# Altium PCB Thunderscope_Rev5.3.PcbDoc (part 9 of 14)
Units mil, origin at the board's own origin, x right, y up, seen from the top; angles counter-clockwise.
Board outline 3937.01 x 3838.58 mil, 6 copper layers (F.Cu, In1.Cu (GND), In2.Cu (Sign), In3.Cu (Sign), In4.Cu (GND), B.Cu), stack 60.556 mil thick; 911 components, 486 nets, 2834 pads, 2761 vias.
Unrouted connection lines stored in the file: 618.
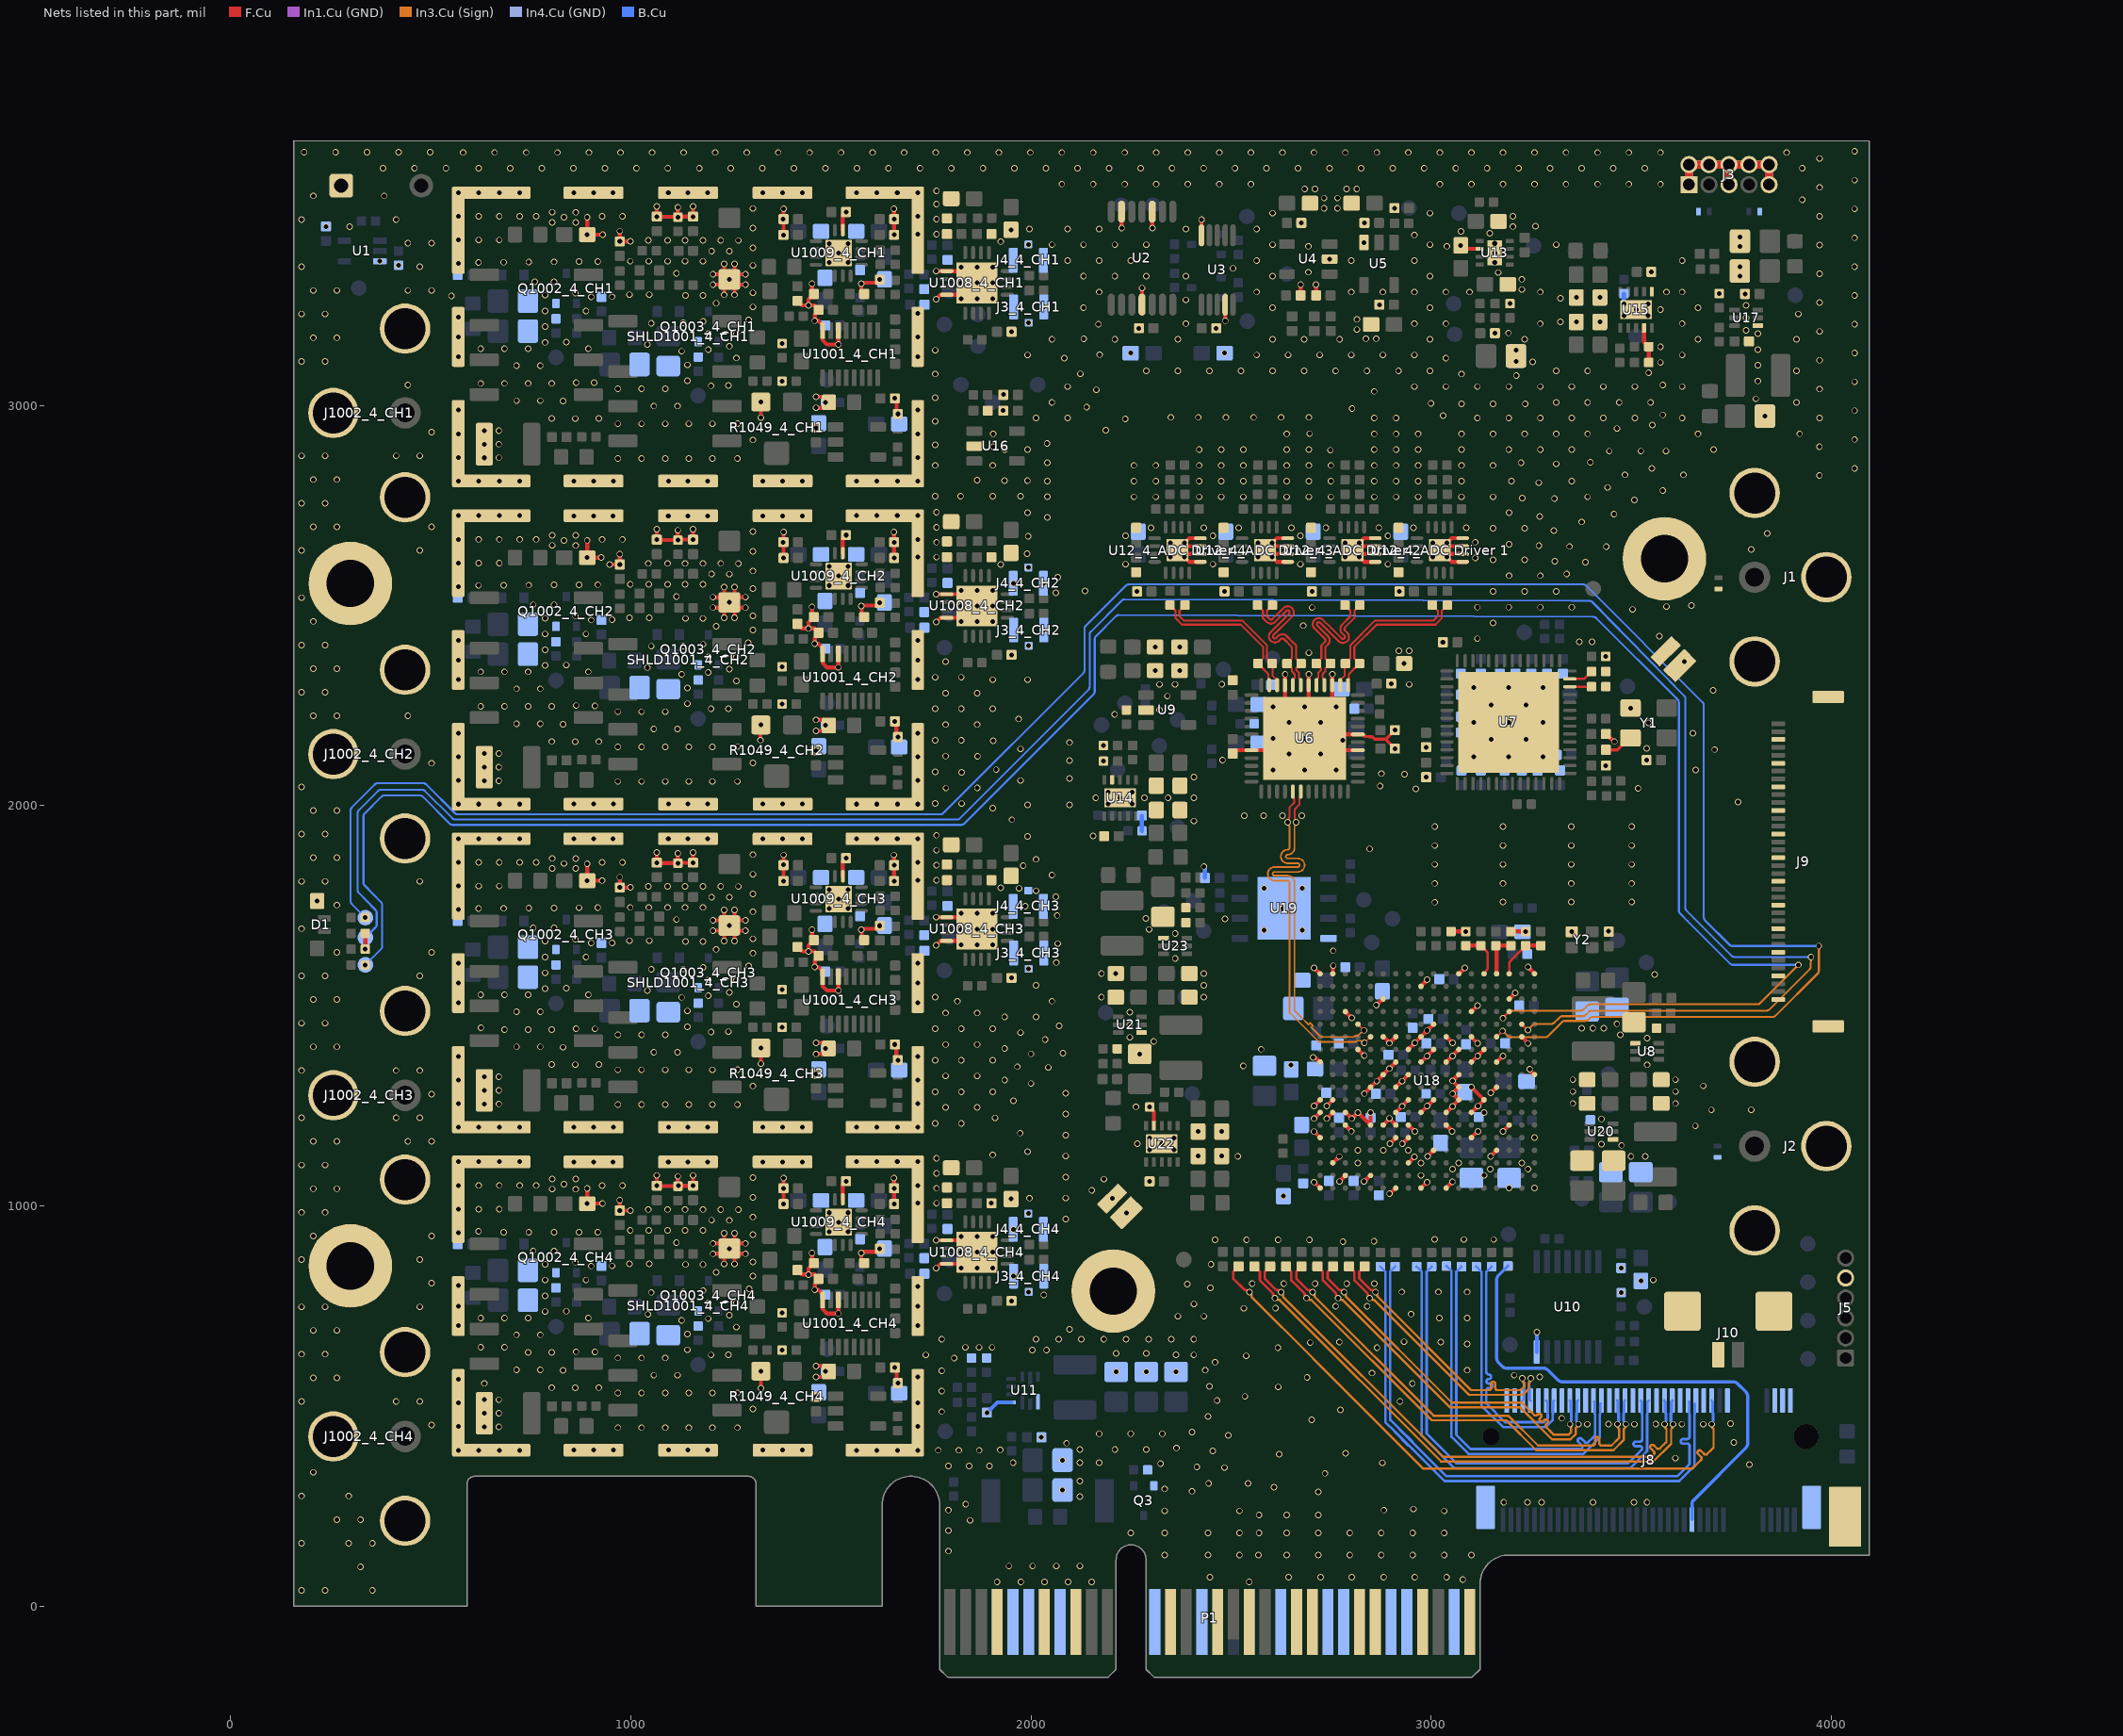
[diagram p12: the nets of this part, all layers, seen from the top]

## Via types
v1: diameter 16, hole 11.81, F.Cu to B.Cu, tented both sides, 2761 vias

## Nets (pads, with @x,y where several pads share a name; then routed paths per layer and width w, separated by ;. In a path a pad name is that pad's centre, name@x,y a point inside that pad or via, vN(x,y) a via of type N, cw(c..) or ccw(c..) an arc to the next point about the centre after c; other vN are vias at no path point) (continued)
GND: (continued)
  other v1: 177.12,39.37 236.18,39.37 354.29,39.37 1915.35,61.02 1974.41,61.02 2033.46,61.02 2092.52,61.02 2151.57,61.02 2545.28,61.02 3078.74,66.93 2446.85,72.83 2643.7,72.83 2723.43,72.83 2801.18,72.83 2880.91,72.83 2958.66,72.83 3038.39,72.83 324.76,98.43 1944.88,100.39 2003.94,100.39 2062.99,100.39 2122.05,100.39 2333.66,127.95 2441.93,127.95 2520.67,127.95 2567.89,127.95 2638.78,127.95 2717.52,127.95 2796.26,127.95 2875,127.95 2953.74,127.95 3032.48,127.95 3100.39,127.95 1793.31,137.8 177.12,157.48 295.23,157.48 354.29,157.48 2249.02,183.07 2333.66,183.07 2441.93,183.07 2520.67,183.07 2569.88,183.07 2638.78,183.07 2717.52,183.07 2796.26,183.07 2875,183.07 2953.74,183.07 3032.48,183.07 1793.31,188.98 1847.44,214.57 265.7,216.54 324.76,216.54 2569.88,228.35 2638.78,228.35 2717.52,228.35 2333.66,238.19 2520.67,238.19 3032.48,238.19 1793.31,240.16 2881.89,240.16 2955.73,242.93 1836.68,254.99 3181.1,259.84 3240.16,259.84 3275.59,259.84 3404.26,260 3506.26,260 3539,260 2122.05,273.62 177.12,275.59 295.23,275.59 2717.52,285.43 2402.56,287.4 2078.74,290.35 2333.66,293.31 2607.28,297.24 2443.9,307.09 2542.32,307.09 2122.05,312.99 2734.73,332.12 206.65,334.65 2483.27,346.46 2414.37,348.43 1793.88,350.39 1845.06,350.39 1896.24,350.39 3795.28,354.33 2323.82,356.3 1955.29,358.55 2122.05,358.55 2170.28,358.55 2877.95,358.27 2078.74,365.16 3610,370 2620,380 2786.01,382.02 2453.74,387.8 568.9,389.76 620.08,389.76 671.26,389.76 722.44,389.76 857.58,389.97 906.8,389.97 956.01,389.97 1093.8,389.97 1143.02,389.97 1192.23,389.97 1330.02,389.97 1379.24,389.97 1428.45,389.97 1563.57,389.76 1614.75,389.76 1665.93,389.76 1717.11,389.76 1768.29,389.76 1819.47,389.76 1870.65,389.76 1922.96,390.88 2122.05,391.73 2209.65,391.73 2288.39,391.73 2363.19,395.67 2088.58,407.48 3755.91,409.45 2025.98,422.24 2493.11,427.17 2170.28,431.1 2249.02,431.1 2327.76,431.1 2402.56,435.04 967.72,446.36 1026.77,446.36 1085.83,446.36 1144.88,446.36 1203.94,446.36 1266.73,446.36 633.94,448 669.93,448 568.9,448.82 1717.11,448.82 501.92,452.76 3389.82,454.8 3442.92,455.05 3507.52,454.72 3561.07,455.01 3626.04,454.72 3679.47,454.8 3748.03,456.69 2700.95,465.65 3326.05,469.86 2441.93,474.41 633.94,482 669.93,482 1776.57,486.22 2772.83,490.68 1304.72,492.62 568.9,507.87 1717.11,507.87 2922.01,511.42 177.12,511.81 413.34,511.81 472.4,511.81 2465,514 633.94,516 669.93,516 1462.6,523.03 2534.45,524.35 967.72,532.97 1026.77,532.97 1085.83,532.97 1144.88,532.97 1203.94,532.97 1266.73,533.46 1776.57,537.4 802.17,546.26 861.22,545.87 920.28,546.26 2617.6,547.68 2445.87,549.21 634,557 2952.77,556.81 568.9,566.93 206.65,570.87 265.7,570.87 2690.06,571.63 1717.11,572.83 3271.32,572.83 1057.28,577.26 1116.34,577.26 3207.11,577.32 2852.15,582.75 2212.77,585.63 2287.57,585.63 2362.38,585.63 1486.22,586.61 1776.57,588.58 830.31,589.57 714.57,590.55 773.62,590.55 2435,590 3090,590 2460,610 967.72,620.57 1026.77,620.57 1085.83,620.57 1808.07,620.08 2537.86,625.59 1200.79,627.95 1243.9,628.44 1737.2,627.95 2362,628 2406.5,627.95 177.12,629.92 236.18,629.92 2213,632 2288,632 743.11,633.86 802.17,633.86 910.24,635.46 863.19,635.86 1377.95,639.76 2003,640 2039,640 1141.14,640.75 2616.99,645.91 2864.55,645.8 625,646.86 684.06,646.86 1835.63,646.65 1870.08,646.65 1902.56,646.65 3090,655.14 2697.27,658.43 2770.21,660.23 3023.87,659.84 2932.22,660.73 1776.57,667.32 2012.8,667.32 2069.04,667.32 2125.28,667.32 2181.52,667.32 2237.77,667.32 2294.01,667.32 2350.25,667.32 2406.5,667.32 714.57,678.15 773.62,678.15 1141.14,680.12 206.65,688.98 265.7,688.98 2096,692 1263.98,697.34 568.9,700.79 1716.93,700.79 1126.77,714.17 1193.7,718.5 625,720.47 684.06,720.47 743.11,720.47 893.7,720.47 3020,720 3090,720.29 2367.13,724.41 2432.09,724.41 1246.06,726.87 1042.96,729.48 2950,730 1377.95,733.27 785.83,736.22 838.58,737.2 2531.47,744.43 2611.18,744.63 177.12,748.03 236.18,748.03 472.4,748.03 568.9,750 1716.93,750 2760.92,749.85 2839.66,749.85 2406.81,754.96 1193.9,757.87 1263.39,757.65 785.83,775.59 2032,778 3474.41,783.46 1051.18,784.25 1131.1,785.04 1994.09,785.43 2926.54,785.43 3017.74,785.43 3090,785.43 1180.71,788.98 1295.37,792.91 2447.83,795.28 1716.93,799.21 569.58,801.32 2390.75,805.12 2552.56,805.76 2631.3,805.76 2710.04,805.76 2788.78,805.76 2857.53,805.92 501.92,807.09 3523.62,812.99 785.83,814.96 887.8,814.96 3555.12,814.96 1304.72,824.8 1956.3,824.8 2031.89,824.8 1213.38,834.15 1825.79,845.47 1865.16,845.47 1904.53,845.47 3474.41,845.08 900.79,850 953.54,850.39 785.83,854.33 1136.61,853.74 1179.92,853.74 2449.8,854.33 996.46,855.51 1045.67,855.51 861.61,859.52 1304.72,860.24 177.12,866.14 472.4,866.14 1205.51,880.71 1286.61,880.71 1825.79,884.84 1865.16,884.84 1904.53,884.84 755.91,887.8 807.87,887.8 1205.51,906.69 1286.61,906.69 1113.78,908.66 2779.46,910.73 2857.02,911.9 1762.8,914.37 2459.89,915.58 2538.39,915.58 2617.13,915.58 2695.87,915.58 3008.28,916.56 3081.34,916.17 3156.15,916.17 1825.79,924.21 1865.16,924.21 1904.53,924.21 206.65,925.2 501.92,925.2 1304.72,928.35 568.82,933.28 682.28,934.25 745.08,934.25 807.87,934.25 870.67,934.25 917.32,934.25 1496.06,936.02 1543.31,936.02 619.49,937.09 998.43,938.98 1045.08,938.98 1091.73,938.98 1135.83,938.98 1179.92,938.98 1955.53,941.59 1519.69,959.65 1201.77,964.57 1246.26,964.37 2087,967.33 1304.72,972.44 1993.33,980.96 1496.06,983.27 1543.31,983.27 2238.25,983.21 177.12,984.25 236.18,984.25 999.21,988.78 1043.7,991.34 1091.73,991.34 1135.83,991.34 1179.92,991.34 1224.41,991.14 1268.9,990.94 568.82,992.33 620,992.13 671.18,992.13 1717.03,1006.89 1763.78,1006.89 1950,1017.52 2202.76,1018.7 1996.06,1019.69 2087,1019.77 1304.72,1021.65 2630.91,1024.61 2152,1039 803.15,1042.22 862.2,1042.02 206.65,1043.31 265.7,1043.31 1763.78,1044.29 568.82,1051.39 620,1051.39 671.18,1051.39 722.36,1051.39 763.78,1051.39 928.15,1051.19 979.33,1051.19 1717.03,1051.39 832.68,1054.72 2296.06,1061.42 803.15,1067.42 862.2,1067.22 2182,1067 1304.72,1070.87 2087,1072.22 1763.78,1081.69 3053.21,1091.99 3147.69,1091.99 3242.18,1091.99 177.12,1102.36 236.18,1102.36 2816.93,1107.78 568.82,1110.44 620,1110.44 671.18,1110.44 722.36,1110.44 857.48,1110.24 906.69,1110.24 955.91,1110.24 1093.7,1110.24 1142.91,1110.24 1192.13,1110.24 1329.92,1110.24 1379.13,1110.24 1428.35,1110.24 1563.49,1110.44 1614.67,1110.44 1665.85,1110.44 1717.03,1110.44 1763.78,1119.09 2517,1124 3499.02,1124.02 3534.45,1124.02 2087,1124.66 2417.32,1125 2476.38,1125 1904.53,1127.95 1991.14,1135.83 2296.46,1140.75 2357.48,1140.75 3475.39,1151.57 3425.2,1154.53 2265.94,1155.51 2326.77,1155.51 206.65,1161.42 265.7,1161.42 442.87,1161.42 501.92,1161.42 2296.46,1170.28 2357.48,1170.28 3257.87,1170.77 2087,1177.11 1973,1182 2417.32,1186.02 2476.38,1186.02 2959.21,1186.38 3425.2,1186.02 2800.52,1186.87 568.9,1196.85 620.08,1196.85 671.26,1196.85 722.44,1196.85 857.58,1197.06 906.8,1197.06 956.01,1197.06 1093.8,1197.06 1143.02,1197.06 1192.23,1197.06 1330.02,1197.06 1379.24,1197.06 1428.45,1197.06 1563.57,1196.85 1614.75,1196.85 1665.93,1196.85 1717.11,1196.85 3660,1200 1760.83,1206.69 1825.79,1206.69 3425.2,1217.52 177.12,1220.47 413.34,1220.47 472.4,1220.47 1910,1220 2087,1229.55 3700,1240 3800,1240 1786.42,1246.06 1865.16,1246.06 2261.81,1248.03 2990.21,1249.86 967.72,1253.44 1026.77,1253.44 1085.83,1253.44 1144.88,1253.44 1203.94,1253.44 1266.73,1253.44 633.94,1255.09 669.93,1255.09 568.9,1255.91 1717.11,1255.91 3353.94,1256.35 3610.63,1256.35 1956,1263 501.92,1279.53 2832.73,1280.97 2087,1282 1760.83,1285.43 1825.79,1285.43 1904.53,1285.43 3353.94,1285.88 3610.63,1285.88 633.94,1289.09 669.93,1289.09 1304.72,1299.7 3680,1300 2000,1306 568.9,1314.96 1717.11,1314.96 1934.05,1314.96 3353.94,1315.4 3610.63,1315.4 633.94,1323.09 669.93,1323.09 1786.42,1324.8 1865.16,1324.8 1462.6,1330.12 177.12,1338.58 413.34,1338.58 472.4,1338.58 967.72,1340.06 1026.77,1340.06 1085.83,1340.06 1144.88,1340.06 1203.94,1340.06 1266.73,1340.55 2895.73,1343.37 2043,1346 1966,1348 2530,1350 2649,1352 802.17,1353.35 861.22,1352.95 920.28,1353.35 3539.37,1352.81 1760.83,1364.17 1825.79,1364.17 1904.53,1364.17 568.9,1374.02 1717.11,1374.02 2000,1380 2271.65,1379.92 2080,1382 1057.28,1384.35 1116.34,1384.35 3539.37,1386.27 2574.8,1391.73 1486.22,1393.7 1934.05,1393.7 830.31,1396.65 206.65,1397.64 265.7,1397.64 714.57,1397.64 773.62,1397.64 1786.42,1403.54 1865.16,1403.54 2306.5,1411.42 2035.38,1415.68 3539.37,1419.73 2247.05,1421.26 967.72,1427.66 1026.77,1427.66 1085.83,1427.66 3472.05,1427.61 1973.43,1433.07 1200.79,1435.04 1243.9,1435.53 684.06,1440.94 743.11,1440.94 802.17,1440.94 910.24,1442.55 863.19,1442.94 1760.83,1442.91 1825.79,1442.91 1904.53,1442.91 3376,1444 3403.54,1443.9 3431,1444 625.33,1445.5 1377.95,1446.85 1141.14,1447.83 2070,1450 2247.05,1452.76 3463.78,1455.17 177.12,1456.69 236.18,1456.69 1934.05,1472.44 2012.8,1472.44 1786.42,1482.28 1865.16,1482.28 2247.05,1484.25 714.57,1485.24 773.62,1485.24 1141.14,1487.2 1263.98,1504.43 568.9,1507.87 1716.93,1507.87 1815.94,1511.81 2052.17,1511.81 206.65,1515.75 265.7,1515.75 1126.77,1521.26 1760.83,1521.65 2175.79,1521.65 2431.5,1521.65 1193.7,1525.59 625,1527.56 684.06,1527.56 743.11,1527.56 893.7,1527.56 1246.06,1533.96 1041.48,1538.04 1377.95,1540.35 785.83,1543.31 838.58,1544.29 2012.8,1551.18 2431.5,1551.18 568.9,1557.09 1716.93,1557.09 1193.9,1564.96 1263.39,1564.74 177.12,1574.8 236.18,1574.8 472.4,1574.8 3558.07,1578.49 2175.79,1580.71 2211.61,1580.71 2431.5,1580.71 785.83,1582.68 1051.18,1591.34 1131.1,1592.13 1994.09,1592.52 1180.71,1596.06 1294.37,1600 2754.98,1600.26 568.9,1606.3 1716.93,1606.3 2062.99,1608.27 2360.24,1618.11 785.83,1622.05 887.8,1622.05 1304.72,1631.89 2031.89,1631.89 265.7,1633.86 501.92,1633.86 2754.92,1637.8 1213.38,1641.24 2360.24,1649.61 1825.79,1652.56 1865.16,1652.56 1904.53,1652.56 2066.93,1655.51 900.79,1657.09 953.54,1657.48 785.83,1661.42 1136.61,1660.83 1179.92,1660.83 996.46,1662.6 1045.67,1662.6 861.61,1666.61 1304.72,1667.32 2360.24,1681.1 1205.51,1687.8 1286.61,1687.8 2582.43,1689.17 2677.45,1689.17 2294.88,1690.94 1825.79,1691.93 1865.16,1691.93 1904.53,1691.93 177.12,1692.91 755.91,1694.88 807.87,1694.88 1205.51,1713.78 1286.61,1713.78 1113.78,1715.75 2484.38,1717.52 2286.61,1718.5 1762.8,1721.46 2065.12,1726.09 1825.79,1731.3 1865.16,1731.3 1904.53,1731.3 1304.72,1735.43 568.82,1740.36 619.49,1743.17 1496.06,1743.11 1543.31,1743.11 682.28,1743.67 745.08,1744.16 2628.94,1743.7 807.87,1744.65 870.67,1745.14 917.32,1745.34 998.43,1746.06 1045.08,1746.06 1091.73,1746.06 1135.83,1746.06 1179.92,1746.06 1985.43,1749.03 265.7,1751.97 3009.05,1758.86 3179.53,1759.62 3350,1759.62 3501.1,1759.62 216.49,1761.81 1519.69,1766.73 1246.26,1771.46 1201.77,1771.65 2062.23,1772.29 1304.72,1779.53 2012.8,1787.4 1496.06,1790.35 1543.31,1790.35 1970.47,1793.31 2582.43,1794.29 2677.45,1794.29 1924.21,1795.28 999.21,1795.87 1043.7,1798.43 1091.73,1798.43 1135.83,1798.43 1179.92,1798.43 1224.41,1798.23 1268.9,1798.03 568.82,1799.42 620,1799.21 671.18,1799.21 3009.05,1806.1 3179.53,1806.1 3350,1806.1 3501.1,1806.1 177.12,1811.02 236.18,1811.02 472.4,1811.02 1717.03,1813.98 1763.78,1813.98 2052.17,1826.77 1304.72,1828.74 803.15,1843.31 862.2,1843.11 1980.31,1850.39 1763.78,1851.38 3009.05,1853.35 3179.53,1853.35 3350,1853.35 3501.1,1853.35 832.68,1855.81 568.82,1858.47 620,1858.47 671.18,1858.47 722.36,1858.47 763.78,1858.47 928.15,1858.28 979.33,1858.28 1717.03,1858.47 2012.8,1866.14 803.15,1868.5 862.2,1868.31 206.65,1870.08 265.7,1870.08 1304.72,1877.95 1763.78,1888.78 2846.06,1892.13 3009.05,1900.59 3179.53,1900.59 3350,1900.59 3501.1,1900.59 568.82,1917.53 620,1917.53 671.18,1917.53 722.36,1917.53 857.48,1917.32 906.69,1917.32 955.91,1917.32 1093.7,1917.32 1142.91,1917.32 1192.13,1917.32 1329.92,1917.32 1379.13,1917.32 1428.35,1917.32 1563.49,1917.53 1614.67,1917.53 1665.85,1917.53 1717.03,1917.53 1991.14,1923.23 2154.72,1924.41 1763.78,1926.18 177.12,1929.13 236.18,1929.13 3009.05,1947.83 3179.53,1947.83 3350,1947.83 3501.1,1947.83 2406.69,1961.61 1952,1965 2533.2,1975.45 2581.33,1975.01 2628.59,1975.45 2676.28,1975.45 206.65,1988.19 265.7,1988.19 1904.53,1994.09 1991.14,2001.97 2096,2002 568.9,2003.94 620.08,2003.94 671.26,2003.94 722.44,2003.94 857.58,2004.14 906.8,2004.14 956.01,2004.14 1093.8,2004.14 1143.02,2004.14 1192.23,2004.14 1330.02,2004.14 1379.24,2004.14 1428.45,2004.14 1563.57,2003.94 1614.75,2003.94 1665.93,2003.94 1717.11,2003.94 1826.41,2005.28 2192.12,2004.92 2253.15,2004.92 1760.83,2005.91 3766.86,2008.95 2161.61,2019.69 2222.44,2019.69 2283.66,2019.69 2342.72,2019.69 2406.69,2019.69 2192.12,2034.45 2253.15,2034.45 2961.61,2042.32 3516.73,2043.46 1787.13,2044.21 1865.78,2044.65 177.12,2047.24 2872.36,2049.4 967.72,2060.53 1026.77,2060.53 1085.83,2060.53 1144.88,2060.53 1203.94,2060.53 1266.73,2060.53 633.94,2062.18 669.93,2062.18 568.9,2062.99 1717.11,2062.99 1973.43,2062.99 2096,2068 2987.2,2071.46 2406.69,2071.85 2933.07,2078.74 2875.66,2080.44 1826.68,2083.76 1760.83,2084.65 2605.04,2089.57 2683.78,2089.57 2762.52,2089.57 3660.57,2089.01 1913,2090 633.94,2096.18 669.93,2096.18 3436.42,2100.39 501.92,2106.3 1304.72,2106.79 2181.1,2111.22 2096,2113 2478.35,2114.17 3537.99,2114.17 568.9,2122.05 1717.11,2122.05 3106.57,2122.05 3193.19,2122.05 3279.8,2122.05 1866.05,2123.13 1786.42,2124.02 2644.41,2128.94 2723.15,2128.94 633.94,2130.18 669.93,2130.18 1462.6,2137.2 3708.32,2140.39 1973.43,2141.73 3538.39,2143.7 967.72,2147.15 1026.77,2147.15 1085.83,2147.15 1144.88,2147.15 1203.94,2147.15 1266.73,2147.64 2181.1,2150.59 2096,2158 802.17,2160.43 861.22,2160.04 920.28,2160.43 1905.42,2162.5 1760.83,2163.39 1825.79,2163.39 2778.54,2163.39 3149.88,2165.35 3236.49,2165.35 2605.04,2168.31 568.9,2181.1 1717.11,2181.1 3653.54,2181.1 1057.28,2191.44 1116.34,2191.44 1486.22,2200.79 1786.42,2202.76 1865.16,2202.76 830.31,2203.74 714.57,2204.72 773.62,2204.72 3543.31,2206.69 2644.41,2207.68 2723.15,2207.68 3106.57,2208.66 3193.19,2208.66 3279.8,2208.66 1969,2217 206.65,2224.41 265.7,2224.41 442.87,2224.41 2208.66,2228.35 967.72,2234.74 1026.77,2234.74 1085.83,2234.74 2321.26,2239.37 1200.79,2242.13 1760.83,2242.13 1825.79,2242.13 1904.53,2242.13 1243.9,2242.62 3498.03,2244.09 2605.04,2247.05 2683.78,2247.05 2762.52,2247.05 625,2248.03 684.06,2248.03 743.11,2248.03 802.17,2248.03 863.19,2250.03 910.24,2249.64 3149.88,2251.97 3236.49,2251.97 1377.95,2253.94 1141.14,2254.92 2340.55,2273.62 1786.42,2281.5 1865.16,2281.5 177.12,2283.46 236.18,2283.46 3704,2288 714.57,2292.32 773.62,2292.32 1141.14,2294.29 3106.57,2295.28 3193.19,2295.28 3279.8,2295.28 2321.26,2303.15 2359.84,2303.15 2476.77,2303.54 2944.88,2303.15 2900,2305.12 1263.98,2311.52 568.9,2314.96 1716.93,2314.96 1904.53,2314.96 1991.14,2314.96 1760.83,2320.87 1825.79,2320.87 1126.77,2328.35 1193.7,2332.68 625,2334.65 684.06,2334.65 743.11,2334.65 893.7,2334.65 2310.04,2337.6 2371.06,2337.6 1246.06,2341.04 206.65,2342.52 265.7,2342.52 1041.48,2345.13 1377.95,2347.44 785.83,2350.39 838.58,2351.38 2932.09,2355.32 1786.42,2360.24 3633,2360 568.9,2364.17 1716.93,2364.17 1193.9,2372.05 1263.39,2371.83 2693.9,2381.89 2919.29,2386.81 2944.88,2386.81 785.83,2389.76 2310.04,2396.65 2371.06,2396.65 1051.18,2398.43 1131.1,2399.21 1994.09,2399.61 177.12,2401.57 236.18,2401.57 1180.71,2403.15 1293.37,2407.09 3029.13,2408.46 3370.08,2409.45 3401.57,2409.45 568.9,2413.39 1716.93,2413.39 3115.16,2417.32 3570.12,2423.46 785.83,2429.13 887.8,2429.13 1304.72,2438.98 2031.89,2438.98 1213.38,2448.33 2680,2450 3154.53,2456.69 1825.79,2459.65 1865.16,2459.65 1904.53,2459.65 206.65,2460.63 900.79,2464.17 953.54,2464.57 785.83,2468.5 1136.61,2467.91 1179.92,2467.91 996.46,2469.69 1045.67,2469.69 861.61,2473.7 1304.72,2474.41 3503.19,2490.39 1205.51,2494.88 1286.61,2494.88 2702,2494.92 3115.16,2496.06 3193.9,2496.06 3272.64,2496.06 3351.38,2496.06 3587.46,2497.46 1825.79,2499.02 1865.16,2499.02 1904.53,2499.02 3650,2500 755.91,2501.97 807.87,2501.97 177.12,2519.68 1205.51,2520.87 1286.61,2520.87 1113.78,2522.83 1762.8,2528.54 2062.23,2532.14 2264.96,2535.43 2483.47,2535.43 2701.97,2535.43 2920.48,2535.43 3154.53,2535.43 3233.27,2535.43 3312.01,2535.43 2135,2537 1825.79,2538.39 1865.16,2538.39 1904.53,2538.39 1304.72,2542.52 568.82,2547.45 619.49,2550.26 1496.06,2550.2 1543.31,2550.2 682.28,2550.75 745.08,2551.24 807.87,2551.74 870.67,2552.23 917.32,2552.43 998.43,2553.15 1045.08,2553.15 1091.73,2553.15 1135.83,2553.15 1179.92,2553.15 1955.53,2555.76 2031.12,2555.76 2067,2571 1519.69,2573.82 3194.88,2574.8 3272.64,2574.8 1246.26,2578.54 1201.77,2578.74 3338.58,2578.74 1304.72,2586.61 1993.33,2595.13 1496.06,2597.44 1543.31,2597.44 946.85,2602.56 1924.21,2602.36 2236.09,2603.35 2454.59,2603.35 2673.1,2603.35 2891.61,2603.35 1043.7,2605.51 1091.73,2605.51 1135.83,2605.51 1179.92,2605.51 1224.41,2605.32 1268.9,2605.12 568.82,2606.5 620,2606.3 671.18,2606.3 3385.08,2608.5 3308.46,2610.63 3154.53,2614.17 3233.27,2614.17 3110.24,2619.09 1717.03,2621.06 1763.78,2621.06 2348.29,2621.06 2566.8,2621.06 2785.3,2621.06 3003.81,2621.06 1990,2630 1304.72,2635.83 177.12,2637.79 472.4,2637.79 3800,2640 3437.46,2647.46 3345.71,2647.87 803.15,2650.39 862.2,2650.2 3269.09,2650 3194.88,2653.54 2348.29,2656.5 2566.8,2656.5 2785.3,2656.5 3003.81,2656.5 1763.78,2658.46 3110.24,2658.46 832.68,2662.89 568.82,2665.56 620,2665.56 671.18,2665.56 722.36,2665.56 763.78,2665.56 928.15,2665.36 979.33,2665.36 1717.03,2665.56 1993,2673 2236.09,2674.21 2454.59,2674.21 2673.1,2674.21 2891.61,2674.21 803.15,2675.59 862.2,2675.39 3840,2680 1304.72,2685.04 3306.34,2687.24 3154.53,2692.91 3233.27,2692.91 2300,2694.49 2432.01,2694.49 2518.51,2694.49 2650.52,2694.49 2737.01,2694.49 2869.03,2694.49 2955.52,2694.49 3087.53,2694.49 1763.78,2695.87 206.65,2696.85 265.7,2696.85 501.92,2696.85 3375.98,2708.93 2041,2720 3270.95,2722.63 857.48,2724.41 906.69,2724.41 955.91,2724.41 1093.7,2724.41 1142.91,2724.41 1192.13,2724.41 1329.92,2724.41 1379.13,2724.41 1428.35,2724.41 568.82,2724.62 620,2724.62 671.18,2724.62 722.36,2724.62 1563.49,2724.62 1614.67,2724.62 1665.85,2724.62 1717.03,2724.62 3456.69,2728.35 1991.14,2732.28 3194.88,2732.28 1763.78,2733.27 177.12,2755.9 236.18,2755.9 3507.87,2763.78 3227.6,2768.45 3308.02,2767.66 2041,2772 2256.88,2771.65 2312,2771.65 2420.27,2771.65 2475.39,2771.65 2530.51,2771.65 2638.77,2771.65 2693.89,2771.65 2749.01,2771.65 2857.28,2771.65 2912.4,2771.65 2967.52,2771.65 3075.79,2771.65 3154.53,2771.65 3390.75,2771.65 1974,2773 1760.83,2773.62 1823.82,2773.62 1904.53,2773.62 3578.74,2787.4 3440.94,2795.28 3268.65,2807.03 568.9,2811.02 620.08,2811.02 671.26,2811.02 722.44,2811.02 857.58,2811.23 906.8,2811.23 956.01,2811.23 1093.8,2811.23 1143.02,2811.23 1192.23,2811.23 1330.02,2811.23 1379.24,2811.23 1428.45,2811.23 1563.57,2811.02 1614.75,2811.02 1665.93,2811.02 1717.11,2811.02 2041,2811 2256.88,2811.02 2312,2811.02 2420.27,2811.02 2475.39,2811.02 2530.51,2811.02 2638.77,2811.02 2693.89,2811.02 2749.01,2811.02 2857.28,2811.02 2912.4,2811.02 2967.52,2811.02 3075.79,2811.02 3200.29,2811.02 3351.38,2811.02 1934,2812 1991,2812 1865.16,2812.99 206.65,2814.96 265.7,2814.96 3970,2825 3484.25,2826.77 3629.92,2826.77 3551.18,2842.52 4058,2843 1760.83,2850.39 1904.53,2850.39 2256.88,2850.39 2312,2850.39 2420.27,2850.39 2475.39,2850.39 2530.51,2850.39 2638.77,2850.39 2693.89,2850.39 2749.01,2850.39 2857.28,2850.39 2912.4,2850.39 2967.52,2850.39 3075.79,2850.39 3154.53,2850.39 3312,2854 2041,2857 3224.35,2857.19 3397.64,2858.27 967.72,2867.62 1026.77,2867.62 1085.83,2867.62 1144.88,2867.62 1203.94,2867.62 1266.73,2867.62 633.94,2869.27 669.93,2869.27 568.9,2870.08 1717.11,2870.08 177.12,2874.01 236.18,2874.01 413.34,2874.01 472.4,2874.01 3444.88,2885.83 3523.62,2885.83 3586.61,2885.83 2747.92,2888.13 1934.05,2889.76 1991.14,2889.76 2420.27,2889.76 2475.39,2889.76 2530.51,2889.76 2638.77,2889.76 2693.89,2889.76 2857.28,2889.76 2912.4,2889.76 2967.52,2889.76 3075.79,2889.76 3193.9,2889.76 3272.64,2889.76 3351.38,2889.76 3705.71,2889.76 1905.51,2896.65 3970,2896.99 1760.83,2901.57 633.94,2903.27 669.93,2903.27 2040,2905 1304.72,2913.88 4058,2914.99 568.9,2929.13 1717.11,2929.13 1905.51,2929.13 2638.77,2929.13 2696.13,2929.38 2857.28,2929.13 2912.4,2929.13 2967.52,2929.13 3075.79,2929.13 3154.53,2929.13 3233.27,2929.13 3312.01,2929.13 3390.75,2929.13 3666.34,2929.13 3920.46,2929.13 501.92,2933.07 633.94,2937.27 669.93,2937.27 2187,2938 3464.21,2942.34 1462.6,2944.29 3552.39,2950.75 967.72,2954.23 1026.77,2954.23 1085.83,2954.23 1144.88,2954.23 1203.94,2954.23 1266.73,2954.72 1760.83,2960.63 2235.43,2966.05 802.17,2967.52 861.22,2967.13 920.28,2967.52 2012.8,2968.5 2091.54,2968.5 2857.28,2968.5 2912.4,2968.5 3115.16,2968.5 3193.9,2968.5 3272.64,2968.5 3351.38,2968.5 3430.12,2968.5 3508.86,2968.5 3626.97,2968.5 3970.47,2968.98 2349,2970.38 2417.98,2970.38 2486.96,2970.38 2555.94,2970.38 2624.92,2970.38 2693.89,2970.38 3833.86,2973.03 3029.9,2974.66 3578.74,2976.38 1930.71,2987.2 4058,2986.98 568.9,2988.19 1717.11,2988.19 2802.17,2992.37 2139,2996 1057.28,2998.52 1116.34,2998.52 3075.79,3004.18 3154.53,3004.18 3234.97,3004.01 2999.55,3005.02 1486.22,3007.87 2052.17,3007.87 3312.01,3007.87 3390.75,3007.87 3469.49,3007.87 3548.23,3007.87 3912.4,3007.87 830.31,3010.83 714.57,3011.81 773.62,3011.81 3810.93,3016.64 1760.83,3019.69 1931.74,3027.1 2857.28,3035.18 2163,3039 3970.47,3040.97 967.72,3041.83 1026.77,3041.83 1085.83,3041.83 2091.54,3047.24 2957.68,3047.24 3036.42,3047.24 3115.16,3047.24 3193.9,3047.24 3272.64,3047.24 3351.38,3047.24 3430.12,3047.24 3508.86,3047.24 3626.97,3047.24 1200.79,3049.21 1243.9,3049.7 442.87,3051.18 3578.74,3051.18 625,3055.12 684.06,3055.12 743.11,3055.12 802.17,3055.12 863.19,3057.12 908,3057.12 4058,3058.97 1377.95,3061.02 3815.94,3061.02 1141.14,3062.01 3212.6,3074.8 1760.83,3078.74 2123,3079 3075.79,3078.74 3543.5,3081.69 2288.39,3086.61 2367.13,3086.61 2445.87,3086.61 2524.61,3086.61 2603.35,3086.61 2682.09,3086.61 2760.83,3086.61 2839.57,3086.61 2918.31,3086.61 2997.05,3086.61 3312.01,3086.61 3390.75,3086.61 3912.4,3086.61 714.57,3099.41 773.62,3099.41 3815.94,3100.39 1141.14,3101.38 3572.83,3107.28 3253.15,3108.66 177.12,3110.24 236.18,3110.24 3212.6,3110.24 3970.47,3112.96 2083,3118 3036.42,3118.11 1263.98,3118.6 568.9,3122.05 1716.93,3122.05 1991.14,3125.98 2563.98,3125.98 2642.72,3125.98 2721.46,3125.98 2800.2,3125.98 2878.94,3125.98 2957.68,3125.98 3626.97,3125.98 2171.26,3126.97 2248.82,3130.71 2483.66,3130.71 4058,3130.96 1126.77,3135.43 1760.83,3137.8 3212.6,3137.8 1193.7,3139.76 3815.94,3139.76 625,3141.73 684.06,3141.73 743.11,3141.73 893.7,3141.73 3572.83,3146.65 1246.06,3148.13 1041.48,3152.22 1377.95,3154.53 785.83,3157.48 838.58,3158.46 2052.17,3165.35 2209.65,3165.35 2367.13,3165.35 2603.35,3165.35 2682.09,3165.35 2771.26,3165.35 2997.05,3165.35 3233.27,3165.35 3666.34,3165.35 3912.4,3165.35 2131.89,3166.34 2836.91,3166.93 2862.5,3166.93 206.65,3169.29 265.7,3169.29 568.9,3171.26 1716.93,3171.26 1193.9,3179.13 1263.39,3178.91 3815.94,3179.13 3159.05,3180.71 3192.91,3181.1 3970.47,3184.95 3786.81,3187.4 2814.27,3189.57 2269.68,3192.91 2462.8,3192.91 785.83,3196.85 2168.55,3203.05 4058,3202.95 1051.18,3205.51 2386.81,3204.72 2957.68,3204.72 3036.42,3204.72 3272.64,3204.72 3626.97,3204.72 1131.1,3206.3 1994.09,3206.69 3322.83,3208.66 3362.4,3208.66 3421.46,3208.66 1180.71,3210.24 1294.37,3214.17 2814.27,3215.16 3786.81,3218.9 568.9,3220.47 3481.3,3224.41 3542.32,3224.41 177.12,3228.35 236.18,3228.35 3917.32,3228.35 1716.93,3230.32 785.83,3236.22 887.8,3236.22 3512.01,3239.17 3572.83,3239.17 2130.91,3244.09 2603.35,3244.09 2997.05,3244.09 3666.34,3244.09 1304.72,3246.06 2031.89,3246.06 3786.81,3250.39 2870.37,3251.57 3196.85,3254.33 3542.32,3253.94 1213.38,3255.41 3970.47,3256.94 2386.81,3263.78 1825.79,3266.73 1865.16,3266.73 1904.53,3266.73 3322.83,3267.72 3362.4,3269.69 3421.46,3269.69 900.79,3271.26 953.54,3271.65 552.08,3273.62 785.83,3275.59 1136.61,3275 1179.92,3275 4058,3274.94 996.46,3276.77 1045.67,3276.77 3784.05,3278.54 3719.49,3279.53 861.61,3280.78 1304.72,3281.5 2170.28,3283.46 2563.98,3283.46 2800.2,3283.46 2878.94,3283.46 2957.68,3283.46 3036.42,3283.46 3095.67,3283.46 3272.64,3283.46 3587.6,3283.46 3626.97,3283.46 206.65,3287.4 265.7,3287.4 442.87,3287.4 501.92,3287.4 3226.57,3289.76 1205.51,3301.97 1286.61,3301.97 1825.79,3306.1 1865.16,3306.1 1904.53,3306.1 760,3309.09 807.87,3309.06 3226.57,3315.35 2130.91,3322.83 2209.65,3322.83 2288.39,3322.83 2386.81,3322.83 2603.35,3322.83 2997.05,3322.83 3771.65,3322.83 1205.51,3327.95 1286.61,3327.95 3970.47,3328.93 1113.78,3329.92 3167.32,3332.09 2692.91,3333.07 3549.8,3333.66 1762.8,3335.63 2504.92,3342.52 1825.79,3345.47 1865.16,3345.47 1904.53,3345.47 177.12,3346.46 472.4,3346.46 3771.65,3346.46 4058,3346.93 419.29,3350.39 1304.72,3349.61 568.82,3354.54 619.49,3357.35 1496.06,3357.28 1543.31,3357.28 682.28,3357.84 745.08,3358.33 3158.66,3357.68 807.87,3358.82 870.67,3359.32 917.32,3359.51 373.03,3360.24 998.43,3360.24 1045.08,3360.24 1091.73,3360.24 1135.83,3360.24 1179.92,3360.24 2091.54,3362.2 2170.28,3362.2 2249.02,3362.2 2563.98,3362.2 2800.2,3362.2 2957.68,3362.2 3626.97,3362.2 2746.06,3365.55 1519.69,3380.91 3158.66,3381.3 1201.77,3385.83 1246.26,3385.63 1304.72,3393.7 2692.91,3397.64 3039.37,3397.64 3771.65,3397.64 2052.17,3401.57 2130.91,3401.57 2209.65,3401.57 2288.39,3401.57 2603.35,3401.57 2997.05,3401.57 3312.01,3401.57 3970.47,3400.92 1993.33,3402.22 1496.06,3404.53 1543.31,3404.53 442.87,3405.51 501.92,3405.51 3158.66,3404.92 2831.99,3407.09 1924.21,3409.45 999.21,3410.04 1224.41,3412.4 1268.9,3412.2 568.82,3413.59 620,3413.39 671.18,3413.39 1043.7,3412.6 1091.73,3412.6 1135.83,3412.6 1179.92,3412.6 4058,3418.92 3771.65,3421.26 2957.68,3425.98 1717.03,3428.15 1763.78,3428.15 3146.46,3430.12 3074.38,3435.03 1950,3438.78 1996.06,3440.94 2091.54,3440.94 2170.28,3440.94 2386.81,3440.94 2563.98,3440.94 1304.72,3442.91 238.19,3447.24 297.24,3446.85 3203.74,3447.24 3260.24,3448.03 2675.59,3456.1 2833.17,3456.1 803.15,3457.48 862.2,3457.28 177.12,3464.57 413.34,3464.57 1763.78,3465.55 832.68,3469.98 928.15,3472.45 979.33,3472.45 568.82,3472.65 620,3472.65 671.18,3472.65 722.36,3472.65 763.78,3472.65 1717.03,3472.65 3203.74,3472.83 3970.47,3472.91 2603.35,3480.32 2997.05,3480.32 862.2,3482.48 803.15,3482.68 4058,3490.91 1304.72,3492.13 2732.28,3492.52 2765.65,3492.52 2907.97,3493.11 1763.78,3502.95 3927.17,3513.78 2732.28,3518.11 2765.65,3518.11 206.65,3523.62 383.81,3523.62 857.48,3531.5 906.69,3531.5 955.91,3531.5 1093.7,3531.5 1142.91,3531.5 1192.13,3531.5 1329.92,3531.5 1379.13,3531.5 1428.35,3531.5 568.82,3531.7 620,3531.7 671.18,3531.7 722.36,3531.7 1563.49,3531.7 1614.67,3531.7 1665.85,3531.7 1717.03,3531.7 1763.78,3536.42 2684.05,3540.75 2709.64,3540.75 2788.29,3540.75 2813.88,3540.75 3970.47,3544.9 2076.77,3553.15 2155.51,3553.15 2234.25,3553.15 2312.99,3553.15 2391.73,3553.15 2470.47,3553.15 2549.21,3553.15 3021.65,3553.15 3100.39,3553.15 3179.13,3553.15 3257.87,3553.15 3336.61,3553.15 3415.35,3553.15 3494.09,3553.15 3572.83,3553.15 4058,3562.9 620.08,3592.52 698.82,3592.52 777.56,3592.52 856.3,3592.52 935.04,3592.52 1013.78,3592.52 1092.52,3592.52 1171.26,3592.52 1250,3592.52 1328.74,3592.52 1407.48,3592.52 1486.22,3592.52 1564.96,3592.52 1643.7,3592.52 1722.44,3592.52 1801.18,3592.52 1879.92,3592.52 1958.66,3592.52 2037.4,3592.52 2116.14,3592.52 2194.88,3592.52 2273.62,3592.52 2352.36,3592.52 2431.1,3592.52 2509.84,3592.52 2588.58,3592.52 2667.32,3592.52 2746.06,3592.52 2824.8,3592.52 2903.54,3592.52 2982.28,3592.52 3061.02,3592.52 3139.76,3592.52 3218.5,3592.52 3297.24,3592.52 3375.98,3592.52 3454.72,3592.52 3533.46,3592.52 3927.17,3592.52 380.52,3593 459.26,3593 538,3593 3970.47,3616.89 183.67,3632.37 262.41,3632.37 341.15,3632.37 419.89,3632.37 498.63,3632.37 580.71,3631.89 659.45,3631.89 738.19,3631.89 816.93,3631.89 895.67,3631.89 974.41,3631.89 1053.15,3631.89 1131.89,3631.89 1210.63,3631.89 1289.37,3631.89 1368.11,3631.89 1446.85,3631.89 1525.59,3631.89 1604.33,3631.89 1683.07,3631.89 1761.81,3631.89 1840.55,3631.89 1919.29,3631.89 1998.03,3631.89 2076.77,3631.89 2155.51,3631.89 2234.25,3631.89 2312.99,3631.89 2391.73,3631.89 2470.47,3631.89 2549.21,3631.89 2627.95,3631.89 2706.69,3631.89 2785.43,3631.89 2864.17,3631.89 2942.91,3631.89 3021.65,3631.89 3100.39,3631.89 3179.13,3631.89 3257.87,3631.89 3336.61,3631.89 3415.35,3631.89 3494.09,3631.89 3572.83,3631.89 3887.8,3631.89 4058,3634.89
HWID0: R75.2 R76.2 U18.T18 | length 124.5
  F.Cu w6: U18.T18@3194.94,1580.08 ccw(c3186.94,1580.23) 3194.94,1580.23 3194.94,1604.34 cw(c3206.94,1604.34) 3198.43,1612.8 R76.2@3236.22,1650.59
  F.Cu w10: R76.2@3236.22,1650.59 R75.2@3273.62,1650.59
HWID1: R77.2 R78.2 U18.R18 | length 108.1
  F.Cu w10: U18.R18@3163.39,1580.22 3163.39,1643.78 R77.2@3161.42,1650.59 R78.2@3198.82,1650.59
HWID2: R79.2 R80.2 U18.P18 | length 117.2
  F.Cu w6: R79.2@3124.02,1650.59 3132.83,1641.78 3137.65,1636.96 cw(c3129.16,1628.47) 3141.16,1628.47 3141.16,1596.56 cw(c3129.16,1596.56) 3138.76,1589.36 U18.P18@3131.89,1580.22
  F.Cu w10: R80.2@3086.61,1650.59 R79.2@3124.02,1650.59
IF0: R49.2 U7.27 | length 61.9
  F.Cu w6: U7.27@3346.46,2316.93 3381.89,2316.93 R49.2@3400.59,2335.63
IF1: R48.2 U7.26 | length 54.1
  F.Cu w6: U7.26@3346.46,2297.24 R48.2@3400.59,2297.24
IN1_N: "R137_4_ADC Driver 4.2" R18.1 U6.47 | length 398.9
  F.Cu w5: 2347.31,2500.98 2360.94,2487.35 2360.94,2468.79 2377.11,2452.61 2523.76,2452.61 2579.58,2396.8 2579.58,2367.97 R18.1@2566.93,2355.32 2593.01,2329.23 2593.01,2316.16 2595.2,2313.98 U6.47@2595.2,2301.18
IN1_P: "R136_4_ADC Driver 4.2" R18.2 U6.46 | length 392.4
  F.Cu w5: 2384.71,2500.98 2371.06,2487.34 2371.06,2472.98 2381.31,2462.74 2527.96,2462.74 2589.71,2400.99 2589.71,2367.97 R18.2@2602.36,2355.32 2603.35,2354.33 2603.35,2325.51 2614.88,2313.98 U6.46@2614.88,2301.18
IN2_N: "R137_4_ADC Driver 3.2" R19.1 U6.44 | length 395.6
  F.Cu w5: 2565.81,2500.98 2579.44,2487.35 2579.44,2468.79 2583.58,2464.65 2587.44,2460.79 2588.92,2459.31 ccw(c2599.62,2470) 2610.31,2459.31 2637.79,2486.78 cw(c2641.35,2483.27) 2644.89,2486.81 cw(c2641.35,2483.27) 2644.89,2479.74 2598.79,2433.64 ccw(c2609.48,2422.94) 2598.79,2412.24 ccw(c2609.48,2422.94) 2620.18,2412.24 2624.55,2416.61 cw(c2628.08,2413.08) 2631.63,2416.6 ; 2631.65,2416.58 2646.52,2401.71 2650.39,2397.85 2652.14,2396.09 2652.14,2367.97 R19.1@2639.49,2355.32 2652.14,2342.66 2652.14,2335.26 2659.03,2328.37 2659.03,2319.47 2654.25,2314.69 U6.44@2654.25,2301.18
IN2_P: "R136_4_ADC Driver 3.2" R19.2 U6.43 | length 395.7
  F.Cu w5: 2603.21,2500.98 2589.57,2487.34 2589.57,2472.98 2590.73,2471.82 2594.6,2467.95 2596.08,2466.47 ccw(c2599.62,2470) 2603.15,2466.47 2632.14,2495.45 2632.38,2495.45 cw(c2641.35,2483.27) 2652.05,2493.97 cw(c2641.35,2483.27) 2652.07,2472.6 2605.95,2426.48 ccw(c2609.48,2422.94) 2605.95,2419.4 ccw(c2609.48,2422.94) 2613.02,2419.4 2617.39,2423.77 cw(c2628.08,2413.08) 2637.05,2425.26 2637.3,2425.26 2638.76,2423.8 2653.68,2408.87 2657.54,2405.01 2662.27,2400.28 2662.27,2367.97 R19.2@2674.92,2355.32 2662.27,2342.66 2662.27,2339.33 2669.07,2332.53 2669.07,2319.12 2673.94,2314.25 U6.43@2673.94,2301.18
IN3_N: "R137_4_ADC Driver 2.2" R20.1 U6.41 | length 395.7
  F.Cu w5: R20.1@2712.32,2355.32 2724.98,2342.66 2724.98,2339.33 2718.18,2332.53 2718.18,2319.12 2713.31,2314.25 U6.41@2713.31,2301.18 ; R20.1@2712.61,2355.31 2725.26,2367.97 2725.26,2400.28 2729.14,2404.16 2734.49,2409.51 ccw(c2730.96,2413.04) 2734.47,2416.6 2708.24,2442.83 cw(c2718.91,2453.55) 2708.21,2464.25 2708.25,2464.29 cw(c2718.91,2453.55) 2727.88,2465.73 2728.12,2465.73 2749.78,2444.08 2775.7,2418.15 ccw(c2779.24,2421.69) 2782.78,2418.15 ccw(c2779.24,2421.69) 2782.78,2425.22 2777.19,2430.81 cw(c2787.88,2441.51) 2777.19,2452.2 2797.97,2472.98 2797.97,2487.13 2797.97,2487.34 2784.32,2500.98
IN3_P: "R136_4_ADC Driver 2.2" R20.2 U6.40 | length 395.7
  F.Cu w5: 2722.47,2457.06 2768.54,2410.99 ccw(c2779.24,2421.69) 2789.94,2410.99 ccw(c2779.24,2421.69) 2789.94,2432.38 2784.35,2437.97 cw(c2787.88,2441.51) 2784.35,2445.04 2808.09,2468.79 2808.09,2469.27 2808.09,2477 2808.09,2487.35 2821.72,2500.98 ; 2722.45,2457.08 ccw(c2718.91,2453.55) 2715.37,2457.09 ccw(c2718.91,2453.55) 2715.37,2450.02 2741.65,2423.74 ; U6.40@2732.99,2301.18 2732.99,2314.69 2728.21,2319.47 2728.21,2328.37 2735.1,2335.26 2735.1,2342.66 R20.2@2747.76,2355.32 ; 2741.67,2423.72 2743.13,2422.26 2743.13,2422.02 cw(c2730.96,2413.04) 2741.65,2402.35 2736.3,2397 2735.39,2396.09 2735.39,2367.97 R20.2@2748.03,2355.32
IN4_N: "R137_4_ADC Driver 1.2" R21.1 U6.38 | length 392.4
  F.Cu w5: U6.38@2772.36,2301.18 2772.36,2313.98 2783.9,2325.51 2783.9,2354.33 R21.1@2784.89,2355.32 ; R21.1@2785.17,2355.32 2797.83,2367.97 2797.83,2400.99 2859.58,2462.74 3006.23,2462.74 3016.47,2472.98 3016.47,2487.34 3002.83,2500.98
IN4_P: "R136_4_ADC Driver 1.2" R21.2 U6.37 | length 398.9
  F.Cu w5: U6.37@2792.05,2301.18 2792.05,2313.98 2794.24,2316.16 2794.24,2329.23 R21.2@2820.32,2355.32 ; R21.2@2820.61,2355.32 2807.95,2367.97 2807.95,2396.8 2863.77,2452.61 3010.42,2452.61 3026.6,2468.79 3026.6,2487.35 3040.23,2500.98
INTREF: C66.2 Y1.3 | length 73.8
  F.Cu w8: C66.2@3436.42,2139.76 3464.57,2139.76 3494.09,2169.29 Y1.3@3498.03,2169.29
JTAG1: P1.B9
JTAG2: P1.A5
JTAG3: P1.A6
JTAG4: P1.A7
JTAG5: P1.A8
LCLK_N: U6.18 U18.D14 | length 964.1
  F.Cu w4.7: v1(2662.59,1958.86) 2660.42,1961.02 2660.42,1967.96 2658.37,1970.02 2658.37,1990.39 2670.45,2002.46 2670.45,2017.75 2673.94,2021.25 U6.18@2673.94,2035.43
  F.Cu w5: U18.D14@2816.99,1454.1 2816.99,1453.6 v1@2832.04,1438.55
  In3.Cu (Sign) w4.3: v1(2662.59,1958.86) 2660.35,1956.62 2660.35,1950.15 2658.17,1947.97 2658.17,1923.97 2658.17,1894.7 cw(c2641.22,1894.7) 2641.22,1877.75 ccw(c2641.22,1873.1) 2641.22,1868.45 2666.45,1868.45 cw(c2666.45,1851.5) 2666.45,1834.55 2608.52,1834.55 ccw(c2608.52,1829.9) 2608.52,1825.25 2641.22,1825.25 cw(c2641.22,1808.3) 2658.17,1808.3 2658.17,1800 2658.17,1488.37 2673.82,1472.72 2675.34,1471.2 2693.27,1453.27 2697.47,1457.46 2704.04,1450.88 2699.85,1446.69 2706.43,1440.12 2707.95,1438.6 2724.03,1422.51 2806.73,1422.51 2809.63,1425.41 2817.62,1425.41 2831.05,1438.84 v1(2832.34,1438.84)
LCLK_P: U6.17 U18.E13 | length 970.1
  F.Cu w4.7: v1(2641.46,1958.86) 2643.62,1961.02 2643.62,1967.96 2645.67,1970.02 2645.67,1995.65 2657.75,2007.72 2657.75,2017.75 2654.25,2021.25 U6.17@2654.25,2035.43
  F.Cu w5: v1(2832.73,1407.34) 2847.99,1422.6 U18.E13@2848.48,1422.6
  In3.Cu (Sign) w4.3: v1(2641.46,1958.86) 2643.7,1956.62 2643.7,1950.15 2645.87,1947.97 2645.87,1923.97 2645.87,1894.7 cw(c2641.22,1894.7) 2641.22,1890.05 ccw(c2641.22,1873.1) 2641.22,1856.15 2666.45,1856.15 cw(c2666.45,1851.5) 2666.45,1846.85 2608.52,1846.85 ccw(c2608.52,1829.9) 2608.52,1812.95 2641.22,1812.95 cw(c2641.22,1808.3) 2645.87,1808.3 2645.87,1800 2645.87,1483.28 2718.94,1410.21 2811.82,1410.21 2814.72,1413.11 2823.8,1413.11 2829.57,1407.34 v1(2832.73,1407.34)
LED_B: R65.2 R85.2 TP58.1 U18.U14 | length 5901.4
  F.Cu w6: U18.U14@3226.43,1454.1 3226.53,1454.1 v1(3241.39,1439.23)
  F.Cu w10: v1(336.61,1641.73) R65.2@336.61,1681.1
  In3.Cu (Sign) w5: v1(3241.39,1439.23) cw(c3250.4,1434.88) 3243.33,1441.95 3253.24,1451.86 cw(c3260.29,1444.77) 3260.29,1454.77 3300.04,1454.77 ccw(c3300.04,1464.77) 3307.09,1457.69 3320.78,1471.38 cw(c3327.82,1464.27) 3327.82,1474.27 3378.79,1474.27 ccw(c3378.79,1484.27) 3385.84,1477.19 3393.81,1485.16 cw(c3400.85,1478.05) 3400.85,1488.05 3838.24,1488.05 ccw(c3838.24,1498.05) 3845.3,1490.97 3945.35,1591.02 ccw(c3938.26,1598.07) 3948.26,1597.84 v1(3948.82,1622.05)
  B.Cu w5: TP58.1@336.61,1670.48 362.08,1695.94 ccw(c354.99,1703) 364.99,1703 364.99,1732.59 ccw(c354.99,1732.59) 362.16,1739.57 320.13,1782.43 cw(c327.3,1789.4) 317.3,1789.36 317.3,1981.75 cw(c327.3,1981.75) 320.21,1988.8 368.63,2037.22 cw(c375.7,2030.15) 375.7,2040.15 478.36,2040.15 cw(c478.36,2030.15) 485.43,2037.22 554.21,1968.44 ccw(c561.24,1975.55) 561.24,1965.55 1815.02,1965.55 ccw(c1815.02,1975.55) 1822.08,1968.46 2143.52,2289.91 ccw(c2136.43,2296.96) 2146.43,2296.96 2146.43,2428.15 cw(c2156.43,2428.15) 2149.35,2435.21 2226.96,2512.82 cw(c2234.01,2505.73) 2234.01,2515.73 3351.4,2511.56 3395.93,2511.56 cw(c3395.93,2501.56) 3403.08,2508.56 3632.19,2274.38 cw(c3625.04,2267.39) 3635.04,2267.39 3635.04,1744.58 ccw(c3645.04,1744.58) 3637.97,1737.51 3656.73,1718.75 3750.54,1624.93 ccw(c3757.57,1632.05) 3757.57,1622.05 v1(3948.82,1622.05)
  B.Cu w10: v1(336.61,1641.73) TP58.1@336.61,1670.48
LED_G: R6.1 TP57.1 U18.R13 | length 5950
  F.Cu w6: U18.R13@3163.58,1422.66 v1(3178.55,1437.63)
  In3.Cu (Sign) w5: v1(3178.55,1437.63) 3191.38,1424.8 ccw(c3198.4,1431.91) 3198.4,1421.91 3285.28,1421.91 ccw(c3285.28,1431.91) 3292.34,1424.82 3327.08,1459.56 cw(c3334.12,1452.46) 3334.12,1462.46 3385.53,1462.46 ccw(c3385.53,1472.46) 3392.59,1465.38 3396.62,1469.41 cw(c3403.66,1462.31) 3403.66,1472.31 3853.01,1472.31 ccw(c3853.01,1482.31) 3860.06,1475.22 3965.59,1580.75 ccw(c3958.5,1587.8) 3968.5,1587.8 v1(3968.5,1649.61)
  B.Cu w5: v1(336.61,1720.47) 302.9,1754.19 cw(c310,1761.23) 300,1761.18 300,1989.07 cw(c310,1989.07) 302.91,1996.12 360.12,2053.33 cw(c367.16,2046.23) 367.16,2056.23 481.83,2056.23 cw(c481.83,2046.23) 488.9,2053.3 561.07,1981.13 ccw(c568.14,1988.2) 568.14,1978.2 1773.27,1978.2 ccw(c1773.27,1988.2) 1780.34,1981.13 2130.5,2331.29 ccw(c2123.41,2338.34) 2133.41,2338.34 2133.41,2441.83 cw(c2143.41,2441.83) 2136.33,2448.89 2237.3,2549.86 cw(c2244.34,2542.76) 2244.34,2552.76 3379.83,2552.76 cw(c3379.83,2542.76) 3386.9,2549.83 3678.17,2258.56 cw(c3671.1,2251.49) 3681.1,2251.49 3681.1,1720.86 ccw(c3691.1,1720.9) 3683.99,1713.88 3684.03,1713.83 3745.37,1652.49 ccw(c3752.4,1659.61) 3752.4,1649.61 v1(3968.5,1649.61)
LED_R: R64.1 TP56.1 U18.T15 | length 5825
  F.Cu w5: v1(3179.19,1469.35) 3179.19,1470.34 3194.45,1485.59 U18.T15@3194.94,1485.59
  F.Cu w6: v1(3179.19,1469.35) v1@3179.87,1469.35
  In3.Cu (Sign) w5: v1(3179.19,1469.35) cw(c3188.36,1465.37) 3181.27,1472.42 3193.99,1485.14 cw(c3201.05,1478.05) 3201.05,1488.05 3373.87,1488.05 ccw(c3373.87,1498.05) 3380.94,1490.98 3390.84,1500.89 cw(c3397.9,1493.8) 3397.9,1503.8 3814.62,1503.8 ccw(c3814.62,1513.8) 3821.68,1506.71 v1(3917.32,1602.36)
  B.Cu w5: v1(336.61,1602.36) 375.85,1641.6 ccw(c368.76,1648.65) 378.76,1648.65 378.76,1752.33 ccw(c368.76,1752.33) 375.89,1759.34 334.77,1800.89 cw(c341.91,1807.89) 331.91,1807.84 331.91,1973.4 cw(c341.91,1973.4) 334.82,1980.45 376.91,2022.54 cw(c383.98,2015.47) 383.98,2025.47 473.33,2025.47 cw(c473.33,2015.47) 480.4,2022.54 547.82,1955.13 ; 547.85,1955.1 ccw(c554.89,1962.2) 554.89,1952.2 1825.83,1952.2 ccw(c1825.83,1962.2) 1832.9,1955.13 2156.25,2278.48 ccw(c2149.17,2285.53) 2159.17,2285.53 2159.17,2416.4 cw(c2169.17,2416.4) 2162.08,2423.45 2212.07,2473.45 cw(c2219.14,2466.38) 2219.19,2476.38 3404.62,2472.14 ; 3404.66,2472.14 cw(c3404.59,2462.14) 3411.66,2469.21 3615.97,2264.9 cw(c3608.9,2257.83) 3618.9,2257.83 3618.9,1737.91 ccw(c3628.9,1737.91) 3621.83,1730.84 3640.54,1712.13 3747.42,1605.25 ccw(c3754.45,1612.36) 3754.45,1602.36 v1(3917.32,1602.36)
M2_PER0_N: C42.1 J8.42 | length 1363.7
  F.Cu w6.2: C42.1@2597.44,849.02 2583.86,835.4 2583.86,819.46 2613.43,789.88 2617,789.88 2621.9,784.98 v1(2624.55,784.98)
  In3.Cu (Sign) w5.7: 2629.65,777.1 2629.65,773.36 3029.27,373.74 3533.13,373.74 3550.7,373.74 3556,379.04 ccw(c3551.97,383.07) 3556,387.1 3548.77,394.33 cw(c3552.56,398.11) 3548.77,401.9 cw(c3552.56,398.11) 3556.34,401.9 3563.57,394.66 ccw(c3567.6,398.69) 3571.63,394.66 3581.21,404.25 3587.85,410.88 3587.85,442.9 3585.17,445.58 3585.17,452.75 v1(3583.2,454.72)
  B.Cu w7.51: J8.42@3582.68,513.78 3584.92,511.54 3584.92,483.98 3586.26,482.63 3586.26,463.37
M2_PER0_P: C43.1 J8.44 | length 1370.8
  F.Cu w6.2: C43.1@2558.07,849.02 2571.66,835.4 2571.66,814.4 2604.8,781.26 2604.8,777.69 2609.7,772.79 v1(2609.7,770.13)
  In3.Cu (Sign) w5.7: 2617.56,765.06 2621.4,765.06 3024.42,362.04 3555.55,362.04 3599.55,406.04 3599.55,442.9 3602.23,445.58 3602.23,452.75 v1(3604.2,454.72)
  B.Cu w7.51: 3598.78,462.45 3598.78,482.63 3600.12,483.98 3600.12,511.54 J8.44@3602.36,513.78
M2_PER1_N: C38.1 J8.30 | length 1148
  F.Cu w6.2: C38.1@2676.18,849.02 2662.6,835.4 2662.6,819.46 2692.17,789.88 2695.74,789.88 2700.64,784.98 v1(2703.29,784.98)
  In3.Cu (Sign) w5.7: v1(2703.29,784.98) 2703.29,782.2 2708.44,777.05 2708.44,773.82 3005.94,476.32 3192.33,476.32 3267.08,401.57 3381.44,401.57 3403.62,401.57 ccw(c3403.62,407.27) 3409.32,407.27 3409.32,417.65 cw(c3414.67,417.65) 3420.02,417.65 3420.02,407.27 ccw(c3425.72,407.27) 3425.72,401.57 3439.27,401.57 3450.48,401.57 3469.74,420.83 3469.74,442.9 3467.06,445.58 3467.06,452.75 v1(3465.09,454.72)
  B.Cu w7.51: J8.30@3464.57,513.78 3466.81,511.54 3466.81,483.98 3468.15,482.63 3468.15,463.37
M2_PER1_P: C39.1 J8.32 | length 1145.1
  F.Cu w6.2: C39.1@2636.81,849.02 2650.4,835.4 2650.4,814.4 2683.54,781.26 2683.54,777.69 2688.44,772.79 v1(2688.44,770.13)
  In3.Cu (Sign) w5.7: 2696.3,765.06 2700.65,765.06 3001.09,464.62 3187.48,464.62 3262.23,389.87 3455.33,389.87 3481.44,415.99 3481.44,442.9 3484.12,445.58 3484.12,452.75 v1(3486.09,454.72)
  B.Cu w7.51: 3480.67,462.45 3480.67,482.63 3482.01,483.98 3482.01,511.54 J8.32@3484.25,513.78
M2_PER2_N: C34.1 J8.18 | length 904.4
  F.Cu w6.2: C34.1@2754.92,849.02 2741.34,835.4 2741.34,819.46 2770.91,789.88 2774.48,789.88 2779.38,784.98 v1(2782.03,784.98)
  In3.Cu (Sign) w5.7: 2787.11,777.12 2787.11,773.22 3051.38,508.94 3226.12,508.94 3247.53,487.53 ; 3249.55,485.52 3256.99,478.08 ccw(c3261.02,482.11) 3265.05,478.08 3266.23,479.26 cw(c3270.01,475.48) 3273.79,479.26 cw(c3270.01,475.48) 3273.79,471.69 3272.37,470.26 ccw(c3276.15,466.48) 3272.37,462.7 ccw(c3276.15,466.48) 3279.93,462.7 3282.44,465.2 cw(c3286.22,461.42) 3290,465.2 cw(c3286.22,461.42) 3290,457.64 3287.74,455.38 ccw(c3291.78,451.35) 3287.74,447.32 3295.31,439.75 ; 3297.33,437.74 3306.5,428.56 3343.13,428.56 3349.81,435.24 3349.81,444.68 3348.95,445.54 3348.95,452.82 v1(3346.98,454.8)
  B.Cu w7.51: J8.18@3346.46,513.78 3348.7,511.54 3348.7,483.98 3350.04,482.63 3350.04,463.44
M2_PER2_P: C35.1 J8.20 | length 926.4
  F.Cu w6.2: C35.1@2715.55,849.02 2729.14,835.4 2729.14,814.4 2762.28,781.26 2762.28,777.69 2767.18,772.79 v1(2767.18,770.13)
  In3.Cu (Sign) w5.7: v1(2767.18,770.13) 2769.97,770.13 2775.1,765 2778.78,765 3046.54,497.24 3221.27,497.24 3301.66,416.86 3347.98,416.86 3361.51,430.39 3361.51,445.54 3367.98,452.01 v1(3367.98,454.8)
  B.Cu w7.51: 3362.56,462.52 3362.56,482.63 3363.9,483.98 3363.9,511.54 J8.20@3366.14,513.78
M2_PER3_N: C30.1 J8.6 | length 675.9
  F.Cu w6.2: C30.1@2833.66,849.02 2820.08,835.4 2820.08,819.46 2849.65,789.88 2853.22,789.88 2858.12,784.98 v1(2860.77,784.98)
  In3.Cu (Sign) w5.7: v1(2860.77,784.98) 2860.77,782.2 2865.92,777.05 2865.92,773.61 3099.56,539.97 3110,539.97 3143.66,539.97 ccw(c3143.66,545.67) 3149.36,545.67 3149.36,555.48 cw(c3154.71,555.48) 3160.06,555.48 3160.06,545.67 ccw(c3165.76,545.67) 3165.76,539.97 3179.31,539.97 3223.58,539.97 3232.34,548.73 3232.34,558.17 3229.66,560.85 3229.66,568.03 v1(3227.69,570)
  B.Cu w6.2: J8.6@3228.35,513.78 3231.25,516.68 3231.25,546.98 3232.09,547.82 3232.09,558.67 3229.56,561.2
M2_PER3_P: C31.1 J8.8 | length 673.1
  F.Cu w6.2: C31.1@2794.29,849.02 2807.88,835.4 2807.88,814.4 2841.02,781.26 2841.02,777.69 2845.92,772.79 v1(2845.92,770.13)
  In3.Cu (Sign) w5.7: 2853.78,765.06 2857.92,765.06 3094.72,528.27 3228.42,528.27 3244.04,543.88 3244.04,558.17 3246.72,560.85 3246.72,568.03 v1(3248.69,570)
  B.Cu w6.2: 3246.81,561.2 3244.29,558.67 3244.29,547.82 3245.13,546.98 3245.13,516.68 J8.8@3248.03,513.78
M2_PERST#: J8.49 R24.2 | length 1276
  B.Cu w8: R24.2@3191.93,850.39 3168.02,826.48 ccw(c3179.35,815.18) 3163.35,815.18 3163.35,620.14 ccw(c3179.35,620.14) 3168.02,608.84 3177.7,599.15 ccw(c3188.99,610.49) 3188.99,594.49 3280.77,594.49 cw(c3280.77,578.49) 3292.07,589.82 3316.45,565.44 ccw(c3327.75,576.76) 3327.75,560.76 3754.22,560.76 cw(c3754.22,544.76) 3765.52,556.09 3785.9,535.71 cw(c3774.57,524.41) 3790.57,524.41 3790.57,406.64 cw(c3774.57,406.64) 3785.9,395.34 3656.25,265.68 ccw(c3667.57,254.38) 3651.57,254.38 J8.49@3651.57,216.54
M2_PET0_N: J8.48 R39.2 | length 1397.7
  B.Cu w6.2: R39.2@2909.78,848.42 2897.51,836.15 2897.51,465.82 2922.18,441.15 ; 2952.35,410.98 2952.35,410.76 3038.27,324.83 3615.06,324.83 3645.47,355.25 3645.47,363.32 3645.47,400.3 ccw(c3639.27,400.3) 3639.27,406.5 3629.02,406.5 cw(c3629.02,412.1) 3629.02,417.7 3639.27,417.7 ccw(c3639.27,423.9) 3645.47,423.9 3645.47,438.2 3645.47,479.74 3644.63,480.58 3644.63,510.88 J8.48@3643.98,511.54
  B.Cu w7.51: 2922.18,441.15 2952.35,410.98
M2_PET0_P: J8.50 R40.2 | length 1399.2
  B.Cu w6.2: R40.2@2873.03,848.42 2885.31,836.15 2885.31,460.33 2909.76,435.88 ; 2943.5,402.13 2943.72,402.13 3033.22,312.63 3620.11,312.63 3657.67,350.2 3657.67,479.74 3658.52,480.58 3658.52,505.83 J8.50@3659.17,506.48
  B.Cu w7.51: 2909.76,435.88 2943.5,402.13
M2_PET1_N: J8.36 R35.2 | length 1162.7
  B.Cu w6.2: R35.2@3000.98,848.42 2988.38,835.82 2988.38,431.73 3062.82,357.3 3491.74,357.3 3493.16,358.72 3527.36,392.93 3527.36,393.75 ccw(c3521.16,393.75) 3521.16,399.96 3510.99,399.96 cw(c3510.99,405.56) 3510.99,411.16 3521.16,411.16 ccw(c3521.16,417.36) 3527.36,417.36 3527.36,454.06 3527.36,479.74 3526.52,480.58 3526.52,510.88 J8.36@3523.62,513.78
M2_PET1_P: J8.38 R36.2 | length 1169.3
  B.Cu w6.2: R36.2@2963.58,848.42 2976.18,835.82 2976.18,426.68 3057.76,345.1 3496.79,345.1 3539.56,387.87 3539.56,479.74 3540.41,480.58 3540.41,510.88 J8.38@3543.31,513.78
M2_PET2_N: J8.24 R31.2 | length 921.4
  B.Cu w6.2: R31.2@3075.44,848.42 3062.84,835.82 3062.84,428.41 3098.37,392.87 3323.33,392.87 3375.1,392.87 3375.8,393.58 ccw(c3371.42,397.96) 3375.8,402.35 3367.91,410.24 cw(c3371.87,414.2) 3367.91,418.16 cw(c3371.87,414.2) 3375.83,418.16 3383.72,410.27 ccw(c3388.1,414.65) 3392.49,410.27 3402.6,420.38 3409.25,427.03 3409.25,479.74 3408.41,480.58 3408.41,510.88 J8.24@3407.76,511.54
M2_PET2_P: J8.26 R32.2 | length 923
  B.Cu w6.2: R32.2@3038.04,850.39 3050.64,837.79 3050.64,423.36 3093.32,380.67 3380.15,380.67 3421.45,421.98 3421.45,479.74 3422.3,480.58 3422.3,505.83 J8.26@3422.95,506.48
M2_PET3_N: J8.12 R27.2 | length 603.5
  B.Cu w6.2: R27.2@3150.59,848.42 3137.81,835.65 3137.81,611.57 3137.81,585.19 ccw(c3144.01,585.19) 3144.01,578.99 cw(c3144.02,573.39) 3144.02,567.79 3143.41,567.79 ccw(c3143.41,562.19) 3143.41,556.59 3147.2,556.59 cw(c3147.2,550.99) 3147.2,545.39 3144.01,545.39 ccw(c3144.01,539.19) 3137.81,539.19 3137.81,524.89 3137.81,506.54 3184.47,459.89 3281.57,459.89 3291.14,469.46 3291.14,479.74 3290.3,480.58 3290.3,510.88 J8.12@3287.4,513.78
M2_PET3_P: J8.14 R28.2 | length 610.1
  B.Cu w6.2: R28.2@3112.84,848.42 3125.61,835.65 3125.61,501.49 3179.42,447.69 3286.62,447.69 3303.34,464.41 3303.34,479.74 3304.19,480.58 3304.19,510.88 J8.14@3307.09,513.78
M2_REFCLK_N: C46.1 J8.54 | length 1592.9
  F.Cu w6.2: C46.1@2518.7,849.02 2505.12,835.4 2505.12,819.46 2534.69,789.88 2538.26,789.88 2543.16,784.98 v1(2545.81,784.98)
  In3.Cu (Sign) w5.7: 2550.89,777.12 2550.89,773.33 2705.76,618.45 2705.76,617.83 2979.2,344.39 3653.17,344.39 3655.47,346.7 3674,365.22 ccw(c3669.97,369.25) 3674,373.28 3666.86,380.42 cw(c3670.65,384.2) 3666.86,387.98 cw(c3670.65,384.2) 3674.43,387.98 3681.56,380.85 ccw(c3685.59,384.88) 3689.62,380.85 3699.2,390.43 3705.57,396.79 3705.57,442.9 3702.89,445.58 3702.89,452.75 v1(3700.92,454.72)
  B.Cu w7.51: J8.54@3700.79,513.78 3703.03,511.54 3703.03,483.98 3704.37,482.63 3704.37,463.37